# Altium PCB ledcube_v2.PcbDoc (part 8 of 18)
Units mil, origin at the board's own origin, x right, y up, seen from the top; angles counter-clockwise.
Board outline 3130 x 3300 mil, 2 copper layers (Top Layer, Bottom Layer); 188 components, 216 nets, 29515 pads, 250 vias.
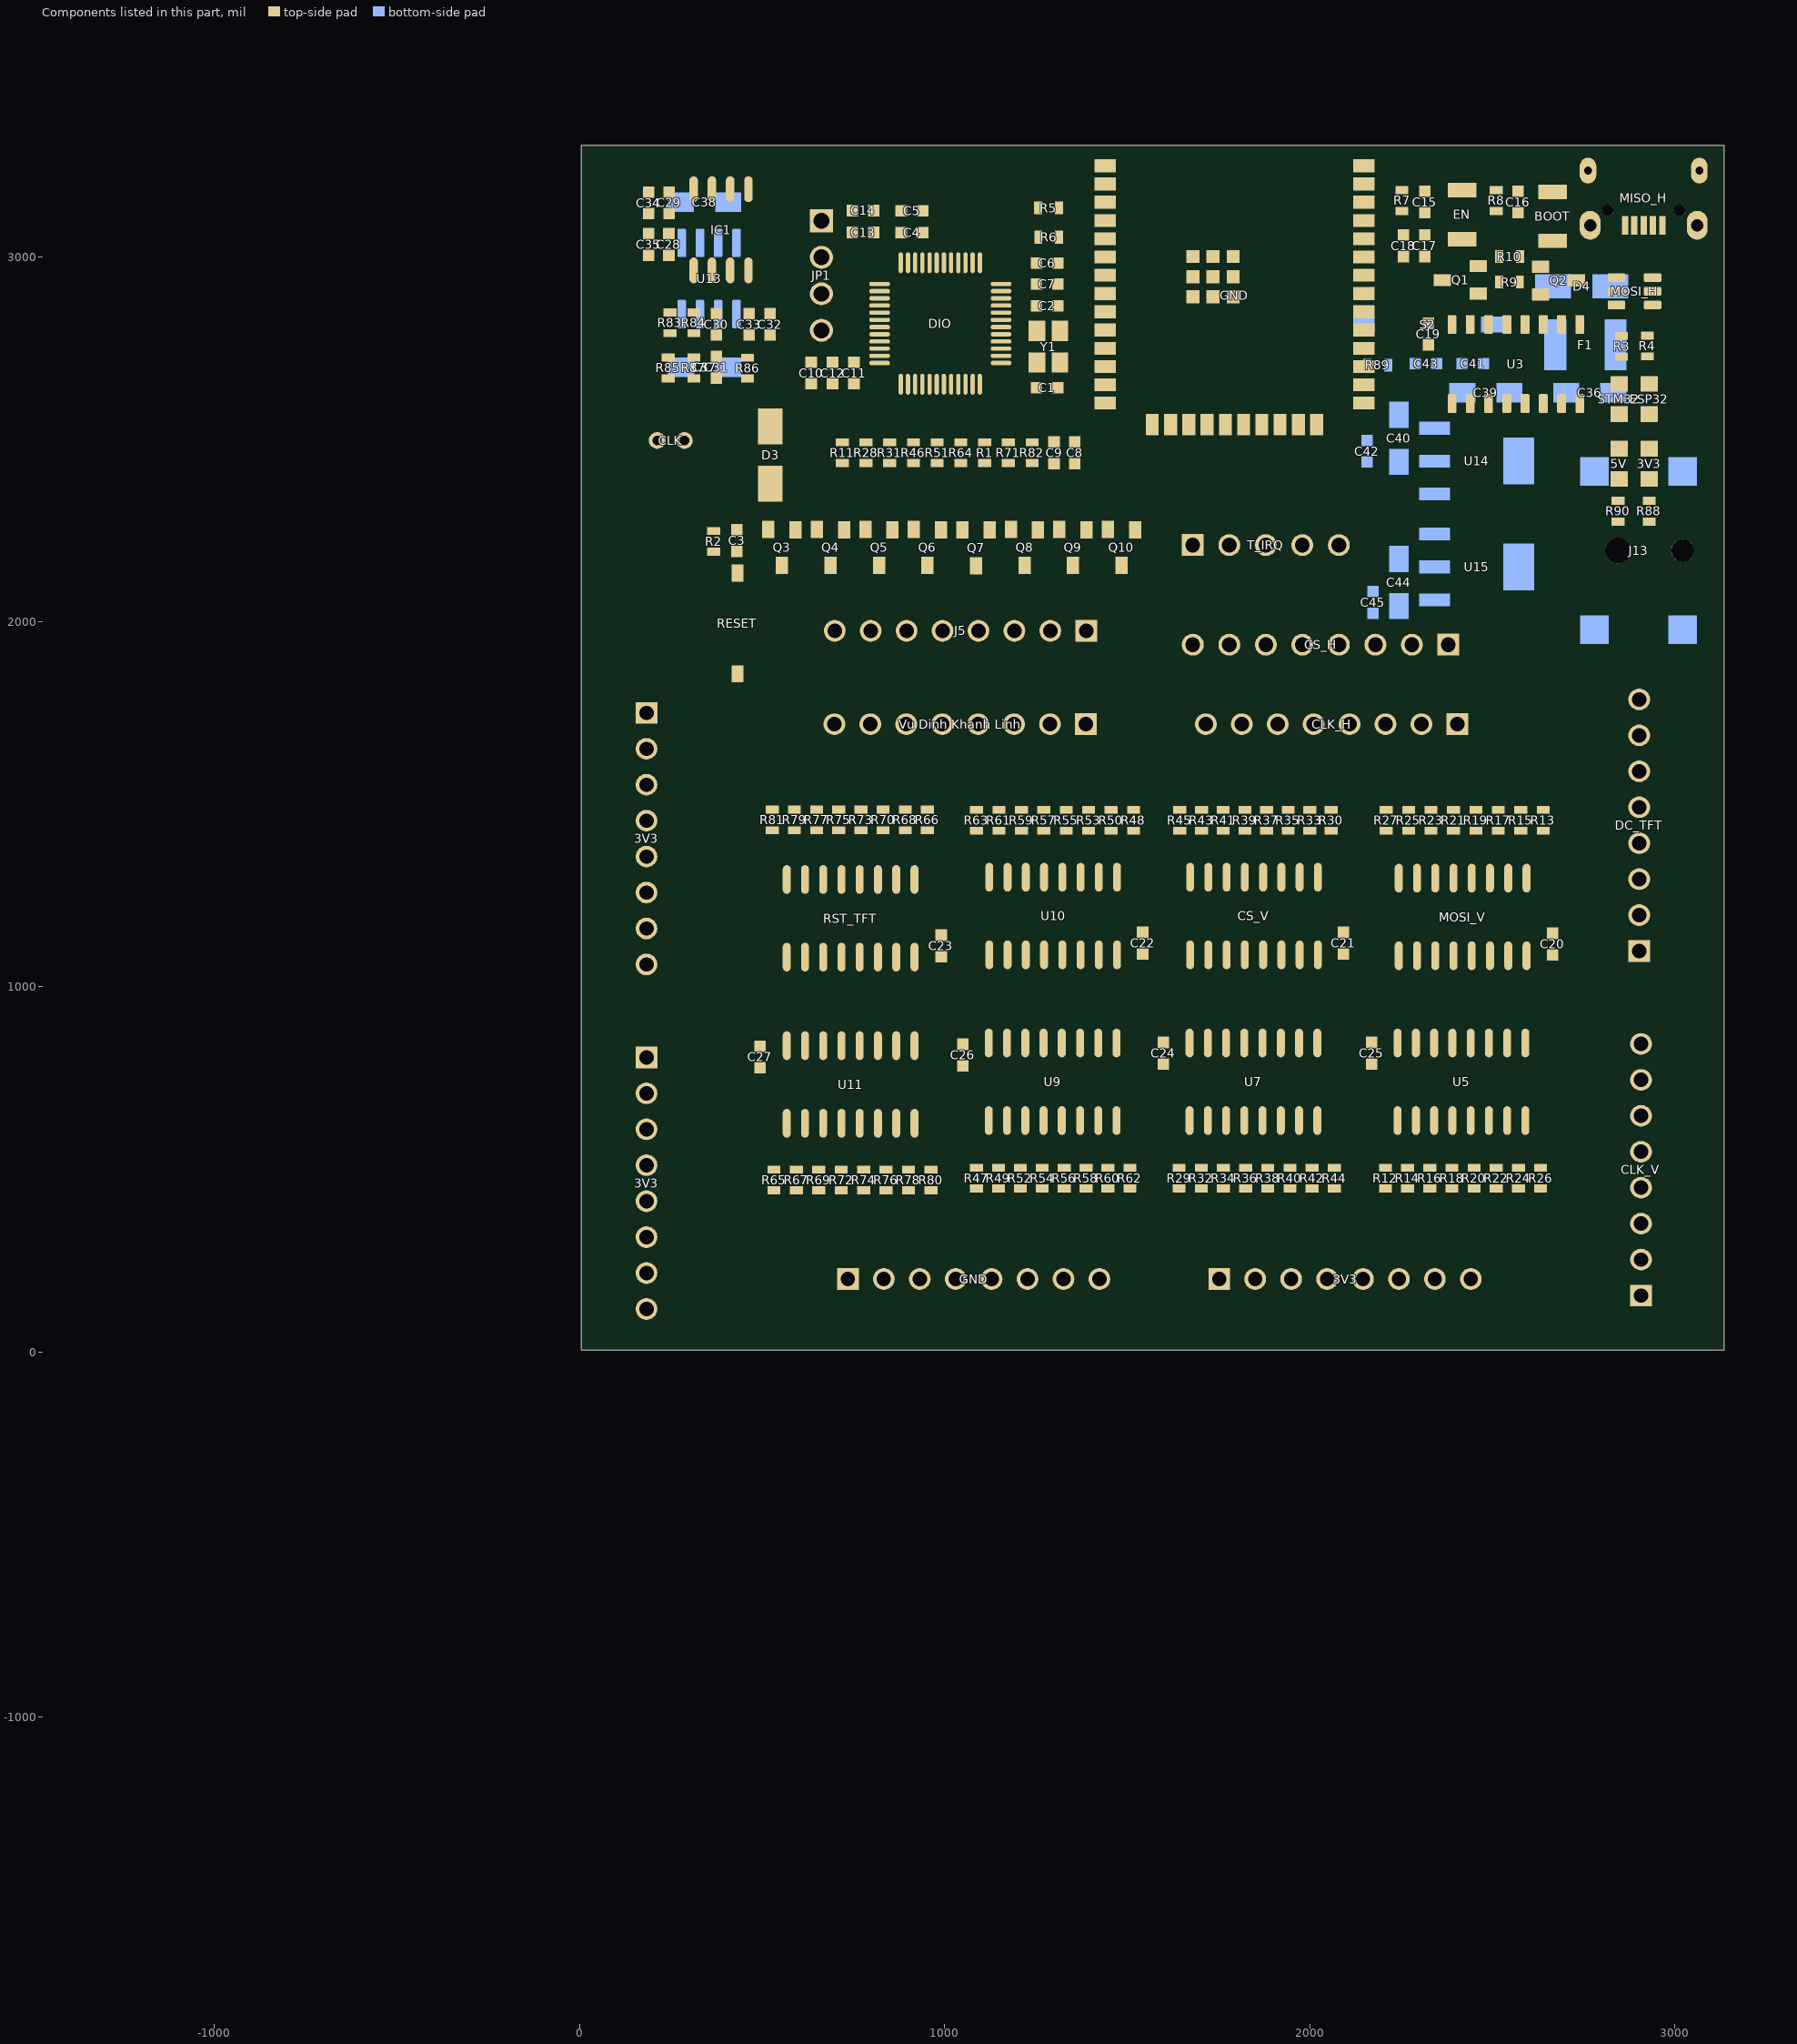
[diagram p7: the components of this part, seen from the top]

## Free pads (board coordinates) (continued)
  round 0 on Mech16: 1(-1373.37,-1735.4) 1(-1373.37,-1735.24) 1(-1373.17,-1735.49) 1(-1373.17,-1735.4) 1(-1373.17,-1735.24) 1(-1372.78,-1737.25) 1(-1372.78,-1737.25) 1(-1372.78,-1737.25) 1(-1372.78,-1737.25) 1(-1372.78,-1737.25) 1(-1372.78,-1737.25) 1(-1372.77,-1737.25) 1(-1372.77,-1737.25) 1(-1372.75,-1737.26) 1(-1372.75,-1737.26) 1(-1372.72,-1737.26) 1(-1372.72,-1737.26) 1(-1372.71,-1737.2) 1(-1372.71,-1737.2) 1(-1372.71,-1737.21) 1(-1372.71,-1737.21) 1(-1372.71,-1737.22) 1(-1372.71,-1737.22) 1(-1372.71,-1737.2) 1(-1372.71,-1737.2) 1(-1372.71,-1737.21) 1(-1372.71,-1737.21) 1(-1372.71,-1737.19) 1(-1372.71,-1737.19) 1(-1372.71,-1737.21) 1(-1372.71,-1737.21) 1(-1372.71,-1737.2) 1(-1372.71,-1737.2) 1(-1372.71,-1737.22) 1(-1372.71,-1737.22) 1(-1372.71,-1737.22) 1(-1372.71,-1737.22) 1(-1372.71,-1737.19) 1(-1372.71,-1737.19) 1(-1372.71,-1737.19) 1(-1372.71,-1737.19) 1(-1372.71,-1737.22) 1(-1372.71,-1737.22) 1(-1372.7,-1737.22) 1(-1372.7,-1737.22) 1(-1372.7,-1737.19) 1(-1372.7,-1737.19) 1(-1372.7,-1737.18) 1(-1372.7,-1737.18) 1(-1372.7,-1737.19) 1(-1372.7,-1737.19) 1(-1372.7,-1737.18) 1(-1372.7,-1737.18) 1(-1372.7,-1737.22) 1(-1372.7,-1737.22) 1(-1372.7,-1737.22) 1(-1372.7,-1737.22) 1(-1372.7,-1737.18) 1(-1372.7,-1737.18) 1(-1372.7,-1737.17) 1(-1372.7,-1737.17) 1(-1372.7,-1737.22) 1(-1372.7,-1737.22) 1(-1372.7,-1737.17) 1(-1372.7,-1737.17) 1(-1372.7,-1737.17) 1(-1372.7,-1737.17) 1(-1372.7,-1737.23) 1(-1372.7,-1737.23) 1(-1372.69,-1737.23) 1(-1372.69,-1737.23) 1(-1372.69,-1737.17) 1(-1372.69,-1737.17) 1(-1372.69,-1737.17) 1(-1372.69,-1737.17) 1(-1372.69,-1737.11) 1(-1372.69,-1737.11) 1(-1372.69,-1737.11) 1(-1372.69,-1737.11) 1(-1372.69,-1737.17) 1(-1372.69,-1737.17) 1(-1372.69,-1737.23) 1(-1372.69,-1737.23) 1(-1372.69,-1737.17) 1(-1372.69,-1737.17) 1(-1372.69,-1737.17) 1(-1372.69,-1737.17) 1(-1372.69,-1737.11) 1(-1372.69,-1737.11) 1(-1372.69,-1737.23) 1(-1372.69,-1737.23) 1(-1372.68,-1737.1) 1(-1372.68,-1737.1) 1(-1372.68,-1737.16) 1(-1372.68,-1737.16) 1(-1372.68,-1737.11) 1(-1372.68,-1737.11) 1(-1372.68,-1737.16) 1(-1372.68,-1737.16) 1(-1372.68,-1737.11) 1(-1372.68,-1737.11) 1(-1372.68,-1737.15) 1(-1372.68,-1737.15) 1(-1372.68,-1737.13) 1(-1372.68,-1737.13) 1(-1372.68,-1737.23) 1(-1372.68,-1737.23) 1(-1372.68,-1737.1) 1(-1372.68,-1737.1) 1(-1372.68,-1737.16) 1(-1372.68,-1737.16) 1(-1372.68,-1737.23) 1(-1372.68,-1737.23) 1(-1372.68,-1737.11) 1(-1372.68,-1737.11) 1(-1372.68,-1737.16) 1(-1372.68,-1737.16) 1(-1372.68,-1737.14) 1(-1372.68,-1737.14) 1(-1372.68,-1737.23) 1(-1372.68,-1737.23) 1(-1372.68,-1737.15) 1(-1372.68,-1737.15) 1(-1372.68,-1737.13) 1(-1372.68,-1737.13) 1(-1372.68,-1737.11) 1(-1372.68,-1737.11) 1(-1372.68,-1737.11) 1(-1372.68,-1737.11) 1(-1372.68,-1737.15) 1(-1372.68,-1737.15) 1(-1372.68,-1737.12) 1(-1372.68,-1737.12) 1(-1372.68,-1737.23) 1(-1372.68,-1737.23) 1(-1372.67,-1737.16) 1(-1372.67,-1737.16) 1(-1372.67,-1737.14) 1(-1372.67,-1737.14) 1(-1372.67,-1737.1) 1(-1372.67,-1737.1) 1(-1372.67,-1737.13) 1(-1372.67,-1737.13) 1(-1372.67,-1737.15) 1(-1372.67,-1737.15) 1(-1372.67,-1737.1) 1(-1372.67,-1737.1) 1(-1372.67,-1737.14) 1(-1372.67,-1737.14) 1(-1372.67,-1737.11) 1(-1372.67,-1737.11) 1(-1372.67,-1737.1) 1(-1372.67,-1737.1) 1(-1372.67,-1737.13) 1(-1372.67,-1737.13) 1(-1372.67,-1737.12) 1(-1372.67,-1737.12) 1(-1372.67,-1737.23) 1(-1372.67,-1737.23) 1(-1372.67,-1737.24) 1(-1372.67,-1737.24) 1(-1372.67,-1737.14) 1(-1372.67,-1737.14) 1(-1372.67,-1737.16) 1(-1372.67,-1737.16) 1(-1372.67,-1737.13) 1(-1372.67,-1737.13) 1(-1372.67,-1737.24) 1(-1372.67,-1737.24) 1(-1372.67,-1737.25) 1(-1372.67,-1737.25) 1(-1372.67,-1737.09) 1(-1372.67,-1737.09) 1(-1372.67,-1737.1) 1(-1372.67,-1737.1) 1(-1372.67,-1737.14) 1(-1372.67,-1737.14) 1(-1372.67,-1737.26) 1(-1372.67,-1737.26) 1(-1372.67,-1737.11) 1(-1372.67,-1737.11) 1(-1372.67,-1737.23) 1(-1372.67,-1737.23) 1(-1372.67,-1737.13) 1(-1372.67,-1737.13) 1(-1372.67,-1737.15) 1(-1372.67,-1737.15) 1(-1372.67,-1737.1) 1(-1372.67,-1737.1) 1(-1372.67,-1737.26) 1(-1372.67,-1737.26) 1(-1372.67,-1737.13) 1(-1372.67,-1737.13) 1(-1372.67,-1737.11) 1(-1372.67,-1737.11) 1(-1372.67,-1737.13) 1(-1372.67,-1737.13) 1(-1372.67,-1737.26) 1(-1372.67,-1737.26) 1(-1372.67,-1737.12) 1(-1372.67,-1737.12) 1(-1372.67,-1737.24) 1(-1372.67,-1737.24) 1(-1372.67,-1737.25) 1(-1372.67,-1737.25) 1(-1372.67,-1737.16) 1(-1372.67,-1737.16) 1(-1372.67,-1737.1) 1(-1372.67,-1737.1) 1(-1372.67,-1737.15) 1(-1372.67,-1737.15) 1(-1372.67,-1737.15) 1(-1372.67,-1737.15) 1(-1372.67,-1737.11) 1(-1372.67,-1737.11) 1(-1372.67,-1737.11) 1(-1372.67,-1737.11) 1(-1372.67,-1737.11) 1(-1372.67,-1737.11) 1(-1372.67,-1737.15) 1(-1372.67,-1737.15) 1(-1372.66,-1737.1) 1(-1372.66,-1737.1) 1(-1372.66,-1737.1) 1(-1372.66,-1737.1) 1(-1372.66,-1737.13) 1(-1372.66,-1737.13) 1(-1372.66,-1737.13) 1(-1372.66,-1737.13) 1(-1372.66,-1737.11) 1(-1372.66,-1737.11) 1(-1372.66,-1737.15) 1(-1372.66,-1737.15) 1(-1372.66,-1737.11) 1(-1372.66,-1737.11) 1(-1372.66,-1737.23) 1(-1372.66,-1737.23) 1(-1372.66,-1737.12) 1(-1372.66,-1737.12) 1(-1372.66,-1737.23) 1(-1372.66,-1737.23) 1(-1372.66,-1737.14) 1(-1372.66,-1737.14) 1(-1372.66,-1737.24) 1(-1372.66,-1737.24) 1(-1372.66,-1737.23) 1(-1372.66,-1737.23) 1(-1372.66,-1737.11) 1(-1372.66,-1737.11) 1(-1372.66,-1737.16) 1(-1372.66,-1737.16) 1(-1372.66,-1737.11) 1(-1372.66,-1737.11) 1(-1372.66,-1737.26) 1(-1372.66,-1737.26) 1(-1372.66,-1737.12) 1(-1372.66,-1737.12) 1(-1372.66,-1737.15) 1(-1372.66,-1737.15) 1(-1372.66,-1737.11) 1(-1372.66,-1737.11) 1(-1372.66,-1737.15) 1(-1372.66,-1737.15) 1(-1372.66,-1737.15) 1(-1372.66,-1737.15) 1(-1372.66,-1737.23) 1(-1372.66,-1737.23) 1(-1372.66,-1737.15) 1(-1372.66,-1737.15) 1(-1372.66,-1737.1) 1(-1372.66,-1737.1) 1(-1372.66,-1737.1) 1(-1372.66,-1737.1) 1(-1372.66,-1737.11) 1(-1372.66,-1737.11) 1(-1372.66,-1737.26) 1(-1372.66,-1737.26) 1(-1372.66,-1737.11) 1(-1372.66,-1737.11) 1(-1372.66,-1737.16) 1(-1372.66,-1737.16) 1(-1372.66,-1737.11) 1(-1372.66,-1737.11) 1(-1372.66,-1737.12) 1(-1372.66,-1737.12) 1(-1372.66,-1737.23) 1(-1372.66,-1737.23) 1(-1372.66,-1737.23) 1(-1372.66,-1737.23) 1(-1372.66,-1737.26) 1(-1372.66,-1737.26) 1(-1372.66,-1737.15) 1(-1372.66,-1737.15) 1(-1372.66,-1737.14) 1(-1372.66,-1737.14) 1(-1372.66,-1737.15) 1(-1372.66,-1737.15) 1(-1372.66,-1737.11) 1(-1372.66,-1737.11) 1(-1372.66,-1737.1) 1(-1372.66,-1737.1) 1(-1372.66,-1737.27) 1(-1372.66,-1737.27) 1(-1372.66,-1737.16) 1(-1372.66,-1737.16) 1(-1372.66,-1737.15) 1(-1372.66,-1737.15) 1(-1372.66,-1737.27) 1(-1372.66,-1737.27) 1(-1372.66,-1737.1) 1(-1372.66,-1737.1) 1(-1372.65,-1737.26) 1(-1372.65,-1737.26) 1(-1372.65,-1737.26) 1(-1372.65,-1737.26) 1(-1372.65,-1737.1) 1(-1372.65,-1737.1) 1(-1372.65,-1737.12) 1(-1372.65,-1737.12) 1(-1372.65,-1737.1) 1(-1372.65,-1737.1) 1(-1372.65,-1737.09) 1(-1372.65,-1737.09) 1(-1372.65,-1737.11) 1(-1372.65,-1737.11) 1(-1372.65,-1737.23) 1(-1372.65,-1737.23) 1(-1372.65,-1737.14) 1(-1372.65,-1737.14) 1(-1372.65,-1737.13) 1(-1372.65,-1737.13) 1(-1372.65,-1737.27) 1(-1372.65,-1737.27) 1(-1372.65,-1737.26) 1(-1372.65,-1737.26) 1(-1372.65,-1737.09) 1(-1372.65,-1737.09) 1(-1372.65,-1737.23) 1(-1372.65,-1737.23) 1(-1372.65,-1737.11) 1(-1372.65,-1737.11) 1(-1372.65,-1737.17) 1(-1372.65,-1737.17) 1(-1372.65,-1737.15) 1(-1372.65,-1737.15) 1(-1372.65,-1737.13) 1(-1372.65,-1737.13) 1(-1372.65,-1737.1) 1(-1372.65,-1737.1) 1(-1372.65,-1737.13) 1(-1372.65,-1737.13) 1(-1372.65,-1737.16) 1(-1372.65,-1737.16) 1(-1372.65,-1737.15) 1(-1372.65,-1737.15) 1(-1372.65,-1737.12) 1(-1372.65,-1737.12) 1(-1372.65,-1737.1) 1(-1372.65,-1737.1) 1(-1372.65,-1737.26) 1(-1372.65,-1737.26) 1(-1372.65,-1737.14) 1(-1372.65,-1737.14) 1(-1372.65,-1737.09) 1(-1372.65,-1737.09) 1(-1372.65,-1737.11) 1(-1372.65,-1737.11) 1(-1372.65,-1737.08) 1(-1372.65,-1737.08) 1(-1372.65,-1737.14) 1(-1372.65,-1737.14) 1(-1372.65,-1737.16) 1(-1372.65,-1737.16) 1(-1372.65,-1737.15) 1(-1372.65,-1737.15) 1(-1372.65,-1737.13) 1(-1372.65,-1737.13) 1(-1372.65,-1737.09) 1(-1372.65,-1737.09) 1(-1372.65,-1737.26) 1(-1372.65,-1737.26) 1(-1372.65,-1737.13) 1(-1372.65,-1737.13) 1(-1372.65,-1737.11) 1(-1372.65,-1737.11) 1(-1372.65,-1737.1) 1(-1372.65,-1737.1) 1(-1372.65,-1737.12) 1(-1372.65,-1737.12) 1(-1372.65,-1737.16) 1(-1372.65,-1737.16) 1(-1372.65,-1737.1) 1(-1372.65,-1737.1) 1(-1372.65,-1737.26) 1(-1372.65,-1737.26) 1(-1372.65,-1737.1) 1(-1372.65,-1737.1) 1(-1372.65,-1737.14) 1(-1372.65,-1737.14) 1(-1372.65,-1737.16) 1(-1372.65,-1737.16) 1(-1372.65,-1737.15) 1(-1372.65,-1737.15) 1(-1372.65,-1737.27) 1(-1372.65,-1737.27) 1(-1372.65,-1737.17) 1(-1372.65,-1737.17) 1(-1372.65,-1737.16) 1(-1372.65,-1737.16) 1(-1372.65,-1737.14) 1(-1372.65,-1737.14) 1(-1372.65,-1737.12) 1(-1372.65,-1737.12) 1(-1372.65,-1737.1) 1(-1372.65,-1737.1) 1(-1372.65,-1737.23) 1(-1372.65,-1737.23) 1(-1372.65,-1737.1) 1(-1372.65,-1737.1) 1(-1372.65,-1737.09) 1(-1372.65,-1737.09) 1(-1372.65,-1737.25) 1(-1372.65,-1737.25) 1(-1372.65,-1737.09) 1(-1372.65,-1737.09) 1(-1372.65,-1737.13) 1(-1372.65,-1737.13) 1(-1372.65,-1737.12) 1(-1372.65,-1737.12) 1(-1372.65,-1737.1) 1(-1372.65,-1737.1) 1(-1372.65,-1737.1) 1(-1372.65,-1737.1) 1(-1372.65,-1737.12) 1(-1372.65,-1737.12) 1(-1372.64,-1737.15) 1(-1372.64,-1737.15) 1(-1372.64,-1737.14) 1(-1372.64,-1737.14) 1(-1372.64,-1737.15) 1(-1372.64,-1737.15) 1(-1372.64,-1737.23) 1(-1372.64,-1737.23) 1(-1372.64,-1737.11) 1(-1372.64,-1737.11) 1(-1372.64,-1737.17) 1(-1372.64,-1737.17) 1(-1372.64,-1737.09) 1(-1372.64,-1737.09) 1(-1372.64,-1737.14) 1(-1372.64,-1737.14) 1(-1372.64,-1737.14) 1(-1372.64,-1737.14) 1(-1372.64,-1737.14) 1(-1372.64,-1737.14) 1(-1372.64,-1737.11) 1(-1372.64,-1737.11) 1(-1372.64,-1737.15) 1(-1372.64,-1737.15) 1(-1372.64,-1737.11) 1(-1372.64,-1737.11) 1(-1372.64,-1737.15) 1(-1372.64,-1737.15) 1(-1372.64,-1737.17) 1(-1372.64,-1737.17) 1(-1372.64,-1737.15) 1(-1372.64,-1737.15) 1(-1372.64,-1737.1) 1(-1372.64,-1737.1) 1(-1372.64,-1737.09) 1(-1372.64,-1737.09) 1(-1372.64,-1737.14) 1(-1372.64,-1737.14) 1(-1372.64,-1737.22) 1(-1372.64,-1737.22) 1(-1372.64,-1737.23) 1(-1372.64,-1737.23) 1(-1372.64,-1737.11) 1(-1372.64,-1737.11) 1(-1372.64,-1737.09) 1(-1372.64,-1737.09) 1(-1372.64,-1737.09) 1(-1372.64,-1737.09) 1(-1372.64,-1737.15) 1(-1372.64,-1737.15) 1(-1372.64,-1737.13) 1(-1372.64,-1737.13) 1(-1372.64,-1737.15) 1(-1372.64,-1737.15) 1(-1372.64,-1737.27) 1(-1372.64,-1737.27) 1(-1372.64,-1737.26) 1(-1372.64,-1737.26) 1(-1372.64,-1737.22) 1(-1372.64,-1737.22) 1(-1372.64,-1737.11) 1(-1372.64,-1737.11) 1(-1372.64,-1737.23) 1(-1372.64,-1737.23) 1(-1372.64,-1737.13) 1(-1372.64,-1737.13) 1(-1372.64,-1737.09) 1(-1372.64,-1737.09) 1(-1372.64,-1737.27) 1(-1372.64,-1737.27) 1(-1372.64,-1737.14) 1(-1372.64,-1737.14) 1(-1372.64,-1737.09) 1(-1372.64,-1737.09) 1(-1372.64,-1737.11) 1(-1372.64,-1737.11) 1(-1372.64,-1737.15) 1(-1372.64,-1737.15) 1(-1372.64,-1737.17) 1(-1372.64,-1737.17) 1(-1372.64,-1737.13) 1(-1372.64,-1737.13) 1(-1372.64,-1737.12) 1(-1372.64,-1737.12) 1(-1372.64,-1737.1) 1(-1372.64,-1737.1) 1(-1372.64,-1737.17) 1(-1372.64,-1737.17) 1(-1372.64,-1737.08) 1(-1372.64,-1737.08) 1(-1372.64,-1737.26) 1(-1372.64,-1737.26) 1(-1372.64,-1737.17) 1(-1372.64,-1737.17) 1(-1372.64,-1737.25) 1(-1372.64,-1737.25) 1(-1372.64,-1737.25) 1(-1372.64,-1737.25) 1(-1372.64,-1737.17) 1(-1372.64,-1737.17) 1(-1372.64,-1737.22) 1(-1372.64,-1737.22) 1(-1372.64,-1737.15) 1(-1372.64,-1737.15) 1(-1372.64,-1737.14) 1(-1372.64,-1737.14) 1(-1372.64,-1737.13) 1(-1372.64,-1737.13) 1(-1372.64,-1737.12) 1(-1372.64,-1737.12) 1(-1372.64,-1737.08) 1(-1372.64,-1737.08) 1(-1372.64,-1737.11) 1(-1372.64,-1737.11) 1(-1372.64,-1737.23) 1(-1372.64,-1737.23) 1(-1372.64,-1737.09) 1(-1372.64,-1737.09) 1(-1372.64,-1737.22) 1(-1372.64,-1737.22) 1(-1372.64,-1737.09) 1(-1372.64,-1737.09) 1(-1372.63,-1737.16) 1(-1372.63,-1737.16) 1(-1372.63,-1737.18) 1(-1372.63,-1737.18) 1(-1372.63,-1737.11) 1(-1372.63,-1737.11) 1(-1372.63,-1737.1) 1(-1372.63,-1737.1) 1(-1372.63,-1737.09) 1(-1372.63,-1737.09) 1(-1372.63,-1737.16) 1(-1372.63,-1737.16) 1(-1372.63,-1737.22) 1(-1372.63,-1737.22) 1(-1372.63,-1737.12) 1(-1372.63,-1737.12) 1(-1372.63,-1737.18) 1(-1372.63,-1737.18) 1(-1372.63,-1737.08) 1(-1372.63,-1737.08) 1(-1372.63,-1737.13) 1(-1372.63,-1737.13) 1(-1372.63,-1737.1) 1(-1372.63,-1737.1) 1(-1372.63,-1737.11) 1(-1372.63,-1737.11) 1(-1372.63,-1737.16) 1(-1372.63,-1737.16) 1(-1372.63,-1737.13) 1(-1372.63,-1737.13) 1(-1372.63,-1737.19) 1(-1372.63,-1737.19) 1(-1372.63,-1737.09) 1(-1372.63,-1737.09) 1(-1372.63,-1737.22) 1(-1372.63,-1737.22) 1(-1372.63,-1737.17) 1(-1372.63,-1737.17) 1(-1372.63,-1737.11) 1(-1372.63,-1737.11) 1(-1372.63,-1737.13) 1(-1372.63,-1737.13) 1(-1372.63,-1737.11) 1(-1372.63,-1737.11) 1(-1372.63,-1737.17) 1(-1372.63,-1737.17) 1(-1372.63,-1737.19) 1(-1372.63,-1737.19) 1(-1372.63,-1737.09) 1(-1372.63,-1737.09) 1(-1372.63,-1737.13) 1(-1372.63,-1737.13) 1(-1372.63,-1737.11) 1(-1372.63,-1737.11) 1(-1372.63,-1737.17) 1(-1372.63,-1737.17) 1(-1372.63,-1737.22) 1(-1372.63,-1737.22) 1(-1372.63,-1737.14) 1(-1372.63,-1737.14) 1(-1372.63,-1737.1) 1(-1372.63,-1737.1) 1(-1372.63,-1737.1) 1(-1372.63,-1737.1) 1(-1372.63,-1737.12) 1(-1372.63,-1737.12) 1(-1372.63,-1737.11) 1(-1372.63,-1737.11) 1(-1372.63,-1737.14) 1(-1372.63,-1737.14) 1(-1372.63,-1737.11) 1(-1372.63,-1737.11) 1(-1372.63,-1737.08) 1(-1372.63,-1737.08) 1(-1372.63,-1737.14) 1(-1372.63,-1737.14) 1(-1372.63,-1737.13) 1(-1372.63,-1737.13) 1(-1372.63,-1737.09) 1(-1372.63,-1737.09) 1(-1372.63,-1737.17) 1(-1372.63,-1737.17) 1(-1372.63,-1737.19) 1(-1372.63,-1737.19) 1(-1372.63,-1737.11) 1(-1372.63,-1737.11) 1(-1372.63,-1737.17) 1(-1372.63,-1737.17) 1(-1372.63,-1737.08) 1(-1372.63,-1737.08) 1(-1372.63,-1737.12) 1(-1372.63,-1737.12) 1(-1372.63,-1737.18) 1(-1372.63,-1737.18) 1(-1372.63,-1737.13) 1(-1372.63,-1737.13) 1(-1372.63,-1737.16) 1(-1372.63,-1737.16) 1(-1372.63,-1737.16) 1(-1372.63,-1737.16) 1(-1372.63,-1737.17) 1(-1372.63,-1737.17) 1(-1372.63,-1737.14) 1(-1372.63,-1737.14) 1(-1372.63,-1737.09) 1(-1372.63,-1737.09) 1(-1372.63,-1737.17) 1(-1372.63,-1737.17) 1(-1372.63,-1737.16) 1(-1372.63,-1737.16) 1(-1372.63,-1737.14) 1(-1372.63,-1737.14) 1(-1372.63,-1737.18) 1(-1372.63,-1737.18) 1(-1372.63,-1737.22) 1(-1372.63,-1737.22) 1(-1372.63,-1737.16) 1(-1372.63,-1737.16) 1(-1372.63,-1737.21) 1(-1372.63,-1737.21) 1(-1372.63,-1737.11) 1(-1372.63,-1737.11) 1(-1372.63,-1737.06) 1(-1372.63,-1737.06) 1(-1372.63,-1737.16) 1(-1372.63,-1737.16) 1(-1372.63,-1737.12) 1(-1372.63,-1737.12) 1(-1372.63,-1737.12) 1(-1372.63,-1737.12) 1(-1372.63,-1737.11) 1(-1372.63,-1737.11) 1(-1372.63,-1737.17) 1(-1372.63,-1737.17) 1(-1372.63,-1737.18) 1(-1372.63,-1737.18) 1(-1372.62,-1737.2) 1(-1372.62,-1737.2) 1(-1372.62,-1737.14) 1(-1372.62,-1737.14) 1(-1372.62,-1737.18) 1(-1372.62,-1737.18) 1(-1372.62,-1737.16) 1(-1372.62,-1737.16) 1(-1372.62,-1737.14) 1(-1372.62,-1737.14) 1(-1372.62,-1737.21) 1(-1372.62,-1737.21) 1(-1372.62,-1737.11) 1(-1372.62,-1737.11) 1(-1372.62,-1737.09) 1(-1372.62,-1737.09) 1(-1372.62,-1737.18) 1(-1372.62,-1737.18) 1(-1372.62,-1737.2) 1(-1372.62,-1737.2) 1(-1372.62,-1737.18) 1(-1372.62,-1737.18) 1(-1372.62,-1737.13) 1(-1372.62,-1737.13) 1(-1372.62,-1737.12) 1(-1372.62,-1737.12) 1(-1372.62,-1737.11) 1(-1372.62,-1737.11) 1(-1372.62,-1737.09) 1(-1372.62,-1737.09) 1(-1372.62,-1737.08) 1(-1372.62,-1737.08) 1(-1372.62,-1737.23) 1(-1372.62,-1737.23) 1(-1372.62,-1737.1) 1(-1372.62,-1737.1) 1(-1372.62,-1737.11) 1(-1372.62,-1737.11) 1(-1372.62,-1737.08) 1(-1372.62,-1737.08) 1(-1372.62,-1737.14) 1(-1372.62,-1737.14) 1(-1372.62,-1737.08) 1(-1372.62,-1737.08) 1(-1372.62,-1737.14) 1(-1372.62,-1737.14) 1(-1372.62,-1737.1) 1(-1372.62,-1737.1) 1(-1372.62,-1737.1) 1(-1372.62,-1737.1) 1(-1372.62,-1737.12) 1(-1372.62,-1737.12) 1(-1372.62,-1737.11) 1(-1372.62,-1737.11) 1(-1372.62,-1737.13) 1(-1372.62,-1737.13) 1(-1372.62,-1737.14) 1(-1372.62,-1737.14) 1(-1372.62,-1737.12) 1(-1372.62,-1737.12) 1(-1372.62,-1737.08) 1(-1372.62,-1737.08) 1(-1372.62,-1737.09) 1(-1372.62,-1737.09) 1(-1372.62,-1737.13) 1(-1372.62,-1737.13) 1(-1372.62,-1737.1) 1(-1372.62,-1737.1) 1(-1372.62,-1737.08) 1(-1372.62,-1737.08) 1(-1372.62,-1737.1) 1(-1372.62,-1737.1) 1(-1372.62,-1737.14) 1(-1372.62,-1737.14) 1(-1372.62,-1737.13) 1(-1372.62,-1737.13) 1(-1372.62,-1737.11) 1(-1372.62,-1737.11) 1(-1372.62,-1737.23) 1(-1372.62,-1737.23) 1(-1372.62,-1737.15) 1(-1372.62,-1737.15) 1(-1372.62,-1737.16) 1(-1372.62,-1737.16) 1(-1372.62,-1737.09) 1(-1372.62,-1737.09) 1(-1372.62,-1737.14) 1(-1372.62,-1737.14) 1(-1372.62,-1737.07) 1(-1372.62,-1737.07) 1(-1372.62,-1737.13) 1(-1372.62,-1737.13) 1(-1372.62,-1737.12) 1(-1372.62,-1737.12) 1(-1372.62,-1737.11) 1(-1372.62,-1737.11) 1(-1372.62,-1737.1) 1(-1372.62,-1737.1) 1(-1372.62,-1737.09) 1(-1372.62,-1737.09) 1(-1372.62,-1737.08) 1(-1372.62,-1737.08) 1(-1372.62,-1737.09) 1(-1372.62,-1737.09) 1(-1372.62,-1737.14) 1(-1372.62,-1737.14) 1(-1372.62,-1737.11) 1(-1372.62,-1737.11) 1(-1372.62,-1737.08) 1(-1372.62,-1737.08) 1(-1372.62,-1737.15) 1(-1372.62,-1737.15) 1(-1372.62,-1737.14) 1(-1372.62,-1737.14) 1(-1372.62,-1737.12) 1(-1372.62,-1737.12) 1(-1372.62,-1737.1) 1(-1372.62,-1737.1) 1(-1372.62,-1737.24) 1(-1372.62,-1737.24) 1(-1372.62,-1737.15) 1(-1372.62,-1737.15) 1(-1372.62,-1737.08) 1(-1372.62,-1737.08) 1(-1372.61,-1737.08) 1(-1372.61,-1737.08) 1(-1372.61,-1737.08) 1(-1372.61,-1737.08) 1(-1372.61,-1737.15) 1(-1372.61,-1737.15) 1(-1372.61,-1737.13) 1(-1372.61,-1737.13) 1(-1372.61,-1737.12) 1(-1372.61,-1737.12) 1(-1372.61,-1737.1) 1(-1372.61,-1737.1) 1(-1372.61,-1737.08) 1(-1372.61,-1737.08) 1(-1372.61,-1737.08) 1(-1372.61,-1737.08) 1(-1372.61,-1737.27) 1(-1372.61,-1737.27) 1(-1372.61,-1737.1) 1(-1372.61,-1737.1) 1(-1372.61,-1737.15) 1(-1372.61,-1737.15) 1(-1372.61,-1737.14) 1(-1372.61,-1737.14) 1(-1372.61,-1737.12) 1(-1372.61,-1737.12) 1(-1372.61,-1737.1) 1(-1372.61,-1737.1) 1(-1372.61,-1737.14) 1(-1372.61,-1737.14) 1(-1372.61,-1737.11) 1(-1372.61,-1737.11) 1(-1372.61,-1737.08) 1(-1372.61,-1737.08) 1(-1372.61,-1737.13) 1(-1372.61,-1737.13) 1(-1372.61,-1737.13) 1(-1372.61,-1737.13) 1(-1372.61,-1737.13) 1(-1372.61,-1737.13) 1(-1372.61,-1737.1) 1(-1372.61,-1737.1) 1(-1372.61,-1737.06) 1(-1372.61,-1737.06) 1(-1372.61,-1737.13) 1(-1372.61,-1737.13) 1(-1372.61,-1737.09) 1(-1372.61,-1737.09) 1(-1372.61,-1737.1) 1(-1372.61,-1737.1) 1(-1372.61,-1737.13) 1(-1372.61,-1737.13) 1(-1372.61,-1737.12) 1(-1372.61,-1737.12) 1(-1372.61,-1737.24) 1(-1372.61,-1737.24) 1(-1372.61,-1737.14) 1(-1372.61,-1737.14) 1(-1372.61,-1737.1) 1(-1372.61,-1737.1) 1(-1372.61,-1737.08) 1(-1372.61,-1737.08) 1(-1372.61,-1737.09) 1(-1372.61,-1737.09) 1(-1372.61,-1737.13) 1(-1372.61,-1737.13) 1(-1372.61,-1737.09) 1(-1372.61,-1737.09) 1(-1372.61,-1737.1) 1(-1372.61,-1737.1) 1(-1372.61,-1737.1) 1(-1372.61,-1737.1) 1(-1372.61,-1737.13) 1(-1372.61,-1737.13) 1(-1372.61,-1737.14) 1(-1372.61,-1737.14) 1(-1372.61,-1737.08) 1(-1372.61,-1737.08) 1(-1372.6,-1737.09) 1(-1372.6,-1737.09) 1(-1372.6,-1737.09) 1(-1372.6,-1737.09) 1(-1372.6,-1737.07) 1(-1372.6,-1737.07) 1(-1372.6,-1737.1) 1(-1372.6,-1737.1) 1(-1372.6,-1737.09) 1(-1372.6,-1737.09) 1(-1372.6,-1737.07) 1(-1372.6,-1737.07) 1(-1372.6,-1737.07) 1(-1372.6,-1737.07) 1(-1372.6,-1737.24) 1(-1372.6,-1737.24) 1(-1372.6,-1737.13) 1(-1372.6,-1737.13) 1(-1372.6,-1737.09) 1(-1372.6,-1737.09) 1(-1372.6,-1737.13) 1(-1372.6,-1737.13) 1(-1372.6,-1737.13) 1(-1372.6,-1737.13) 1(-1372.6,-1737.09) 1(-1372.6,-1737.09) 1(-1372.6,-1737.07) 1(-1372.6,-1737.07) 1(-1372.6,-1737.06) 1(-1372.6,-1737.06) 1(-1372.6,-1737.1) 1(-1372.6,-1737.1) 1(-1372.6,-1737.07) 1(-1372.6,-1737.07) 1(-1372.6,-1737.13) 1(-1372.6,-1737.13) 1(-1372.6,-1737.12) 1(-1372.6,-1737.12) 1(-1372.6,-1737.13) 1(-1372.6,-1737.13) 1(-1372.6,-1737.24) 1(-1372.6,-1737.24) 1(-1372.6,-1737.14) 1(-1372.6,-1737.14) 1(-1372.6,-1737.07) 1(-1372.6,-1737.07) 1(-1372.6,-1737.13) 1(-1372.6,-1737.13) 1(-1372.6,-1737.06) 1(-1372.6,-1737.06) 1(-1372.6,-1737.13) 1(-1372.6,-1737.13) 1(-1372.6,-1737.07) 1(-1372.6,-1737.07) 1(-1372.6,-1737.06) 1(-1372.6,-1737.06) 1(-1372.6,-1737.07) 1(-1372.6,-1737.07) 1(-1372.6,-1737.12) 1(-1372.6,-1737.12) 1(-1372.6,-1737.08) 1(-1372.6,-1737.08) 1(-1372.6,-1737.24) 1(-1372.6,-1737.24) 1(-1372.6,-1737.13) 1(-1372.6,-1737.13) 1(-1372.6,-1737.1) 1(-1372.6,-1737.1) 1(-1372.6,-1737.08) 1(-1372.6,-1737.08) 1(-1372.6,-1737.07) 1(-1372.6,-1737.07) 1(-1372.6,-1737.07) 1(-1372.6,-1737.07) 1(-1372.6,-1737.11) 1(-1372.6,-1737.11) 1(-1372.6,-1737.07) 1(-1372.6,-1737.07) 1(-1372.6,-1737.07) 1(-1372.6,-1737.07) 1(-1372.6,-1737.14) 1(-1372.6,-1737.14) 1(-1372.6,-1737.13) 1(-1372.6,-1737.13) 1(-1372.6,-1737.11) 1(-1372.6,-1737.11) 1(-1372.6,-1737.14) 1(-1372.6,-1737.14) 1(-1372.6,-1737.12) 1(-1372.6,-1737.12) 1(-1372.6,-1737.07) 1(-1372.6,-1737.07) 1(-1372.59,-1737.1) 1(-1372.59,-1737.1) 1(-1372.59,-1737.07) 1(-1372.59,-1737.07) 1(-1372.59,-1737.12) 1(-1372.59,-1737.12) 1(-1372.59,-1737.11) 1(-1372.59,-1737.11) 1(-1372.59,-1737.09) 1(-1372.59,-1737.09) 1(-1372.59,-1737.07) 1(-1372.59,-1737.07) 1(-1372.59,-1737.14) 1(-1372.59,-1737.14) 1(-1372.59,-1737.05) 1(-1372.59,-1737.05) 1(-1372.59,-1737.07) 1(-1372.59,-1737.07) 1(-1372.59,-1737.24) 1(-1372.59,-1737.24) 1(-1372.59,-1737.11) 1(-1372.59,-1737.11) 1(-1372.59,-1737.09) 1(-1372.59,-1737.09) 1(-1372.59,-1737.14) 1(-1372.59,-1737.14) 1(-1372.59,-1737.13) 1(-1372.59,-1737.13) 1(-1372.59,-1737.14) 1(-1372.59,-1737.14) 1(-1372.59,-1737.06) 1(-1372.59,-1737.06) 1(-1372.59,-1737.13) 1(-1372.59,-1737.13) 1(-1372.59,-1737.11) 1(-1372.59,-1737.11) 1(-1372.59,-1737.09) 1(-1372.59,-1737.09) 1(-1372.59,-1737.1) 1(-1372.59,-1737.1) 1(-1372.59,-1737.08) 1(-1372.59,-1737.08) 1(-1372.59,-1737.12) 1(-1372.59,-1737.12) 1(-1372.59,-1737.08) 1(-1372.59,-1737.08) 1(-1372.59,-1737.09) 1(-1372.59,-1737.09) 1(-1372.59,-1737.13) 1(-1372.59,-1737.13) 1(-1372.59,-1737.09) 1(-1372.59,-1737.09) 1(-1372.59,-1737.09) 1(-1372.59,-1737.09) 1(-1372.59,-1737.12) 1(-1372.59,-1737.12) 1(-1372.59,-1737.13) 1(-1372.59,-1737.13) 1(-1372.59,-1737.09) 1(-1372.59,-1737.09) 1(-1372.59,-1737.08) 1(-1372.59,-1737.08) 1(-1372.59,-1737.08) 1(-1372.59,-1737.08) 1(-1372.59,-1737.05) 1(-1372.59,-1737.05) 1(-1372.59,-1737.08) 1(-1372.59,-1737.08) 1(-1372.59,-1737.07) 1(-1372.59,-1737.07) 1(-1372.59,-1737.11) 1(-1372.59,-1737.11) 1(-1372.59,-1737.08) 1(-1372.59,-1737.08) 1(-1372.59,-1737.06) 1(-1372.59,-1737.06) 1(-1372.58,-1737.28) 1(-1372.58,-1737.28) 1(-1372.58,-1737.12) 1(-1372.58,-1737.12) 1(-1372.58,-1737.13) 1(-1372.58,-1737.13) 1(-1372.58,-1737.27) 1(-1372.58,-1737.27) 1(-1372.58,-1737.27) 1(-1372.58,-1737.27) 1(-1372.58,-1737.27) 1(-1372.58,-1737.27) 1(-1372.58,-1737.09) 1(-1372.58,-1737.09) 1(-1372.58,-1737.08) 1(-1372.58,-1737.08) 1(-1372.58,-1737.12) 1(-1372.58,-1737.12) 1(-1372.58,-1737.27) 1(-1372.58,-1737.27) 1(-1372.58,-1737.27) 1(-1372.58,-1737.27) 1(-1372.58,-1737.08) 1(-1372.58,-1737.08) 1(-1372.58,-1737.08) 1(-1372.58,-1737.08) 1(-1372.58,-1737.28) 1(-1372.58,-1737.28) 1(-1372.58,-1737.28) 1(-1372.58,-1737.28) 1(-1372.58,-1737.13) 1(-1372.58,-1737.13) 1(-1372.58,-1737.08) 1(-1372.58,-1737.08) 1(-1372.58,-1737.12) 1(-1372.58,-1737.12) 1(-1372.58,-1737.08) 1(-1372.58,-1737.08) 1(-1372.58,-1737.08) 1(-1372.58,-1737.08) 1(-1372.58,-1737.13) 1(-1372.58,-1737.13) 1(-1372.58,-1737.08) 1(-1372.58,-1737.08) 1(-1372.58,-1737.12) 1(-1372.58,-1737.12) 1(-1372.58,-1737.27) 1(-1372.58,-1737.27) 1(-1372.58,-1737.06) 1(-1372.58,-1737.06) 1(-1372.58,-1737.03) 1(-1372.58,-1737.03) 1(-1372.58,-1737.12) 1(-1372.58,-1737.12) 1(-1372.58,-1737.25) 1(-1372.58,-1737.25) 1(-1372.58,-1737.27) 1(-1372.58,-1737.27) 1(-1372.58,-1737.12) 1(-1372.58,-1737.12) 1(-1372.58,-1737.05) 1(-1372.58,-1737.05) 1(-1372.58,-1737.08) 1(-1372.58,-1737.08) 1(-1372.58,-1737.27) 1(-1372.58,-1737.27) 1(-1372.58,-1737.13) 1(-1372.58,-1737.13) 1(-1372.58,-1737.11) 1(-1372.58,-1737.11) 1(-1372.58,-1737.04) 1(-1372.58,-1737.04) 1(-1372.58,-1737.08) 1(-1372.58,-1737.08) 1(-1372.58,-1737.09) 1(-1372.58,-1737.09) 1(-1372.58,-1737.05) 1(-1372.58,-1737.05) 1(-1372.58,-1737.05) 1(-1372.58,-1737.05) 1(-1372.58,-1737.27) 1(-1372.58,-1737.27) 1(-1372.57,-1737.13) 1(-1372.57,-1737.13) 1(-1372.57,-1737.26) 1(-1372.57,-1737.26) 1(-1372.57,-1737.26) 1(-1372.57,-1737.26) 1(-1372.57,-1737.26) 1(-1372.57,-1737.26) 1(-1372.57,-1737.06) 1(-1372.57,-1737.06) 1(-1372.57,-1737.27) 1(-1372.57,-1737.27) 1(-1372.57,-1737.26) 1(-1372.57,-1737.26) 1(-1372.57,-1737.13) 1(-1372.57,-1737.13) 1(-1372.57,-1737.06) 1(-1372.57,-1737.06) 1(-1372.57,-1737.04) 1(-1372.57,-1737.04) 1(-1372.57,-1737.26) 1(-1372.57,-1737.26) 1(-1372.57,-1737.05) 1(-1372.57,-1737.05) 1(-1372.57,-1737.27) 1(-1372.57,-1737.27) 1(-1372.57,-1737.26) 1(-1372.57,-1737.26) 1(-1372.57,-1737.06) 1(-1372.57,-1737.06) 1(-1372.57,-1737.06) 1(-1372.57,-1737.06) 1(-1372.57,-1737.27) 1(-1372.57,-1737.27) 1(-1372.57,-1737.13) 1(-1372.57,-1737.13) 1(-1372.57,-1737.05) 1(-1372.57,-1737.05) 1(-1372.57,-1737.05) 1(-1372.57,-1737.05) 1(-1372.57,-1737.03) 1(-1372.57,-1737.03) 1(-1372.57,-1737.05) 1(-1372.57,-1737.05) 1(-1372.57,-1737.27) 1(-1372.57,-1737.27) 1(-1372.57,-1737.13) 1(-1372.57,-1737.13) 1(-1372.57,-1737.27) 1(-1372.57,-1737.27) 1(-1372.57,-1737.05) 1(-1372.57,-1737.05) 1(-1372.57,-1737.27) 1(-1372.57,-1737.27) 1(-1372.57,-1737.13) 1(-1372.57,-1737.13) 1(-1372.57,-1737.05) 1(-1372.57,-1737.05) 1(-1372.57,-1737.27) 1(-1372.57,-1737.27) 1(-1372.57,-1737.13) 1(-1372.57,-1737.13) 1(-1372.57,-1737.06) 1(-1372.57,-1737.06) 1(-1372.57,-1737.05) 1(-1372.57,-1737.05) 1(-1372.57,-1737.05) 1(-1372.57,-1737.05) 1(-1372.57,-1737.13) 1(-1372.57,-1737.13) 1(-1372.57,-1737.28) 1(-1372.57,-1737.28) 1(-1372.57,-1737.27) 1(-1372.57,-1737.27) 1(-1372.57,-1737.27) 1(-1372.57,-1737.27) 1(-1372.57,-1737.26) 1(-1372.57,-1737.26) 1(-1372.57,-1737.05) 1(-1372.57,-1737.05) 1(-1372.57,-1737.13) 1(-1372.57,-1737.13) 1(-1372.57,-1737.09) 1(-1372.57,-1737.09) 1(-1372.57,-1737.12) 1(-1372.57,-1737.12) 1(-1372.57,-1737.09) 1(-1372.57,-1737.09) 1(-1372.57,-1737.26) 1(-1372.57,-1737.26) 1(-1372.57,-1737.13) 1(-1372.57,-1737.13) 1(-1372.57,-1737.13) 1(-1372.57,-1737.13) 1(-1372.56,-1737.09) 1(-1372.56,-1737.09) 1(-1372.56,-1737.08) 1(-1372.56,-1737.08) 1(-1372.56,-1737.27) 1(-1372.56,-1737.27) 1(-1372.56,-1737.27) 1(-1372.56,-1737.27) 1(-1372.56,-1737.27) 1(-1372.56,-1737.27) 1(-1372.56,-1737.12) 1(-1372.56,-1737.12) 1(-1372.56,-1737.12) 1(-1372.56,-1737.12) 1(-1372.56,-1737.09) 1(-1372.56,-1737.09) 1(-1372.56,-1737.27) 1(-1372.56,-1737.27) 1(-1372.56,-1737.13) 1(-1372.56,-1737.13) 1(-1372.56,-1737.29) 1(-1372.56,-1737.29) 1(-1372.56,-1737.25) 1(-1372.56,-1737.25) 1(-1372.56,-1737.03) 1(-1372.56,-1737.03) 1(-1372.56,-1737.26) 1(-1372.56,-1737.26) 1(-1372.56,-1737.26) 1(-1372.56,-1737.26) 1(-1372.56,-1737.12) 1(-1372.56,-1737.12) 1(-1372.56,-1737.26) 1(-1372.56,-1737.26) 1(-1372.56,-1737.26) 1(-1372.56,-1737.26) 1(-1372.56,-1737.05) 1(-1372.56,-1737.05) 1(-1372.56,-1737.13) 1(-1372.56,-1737.13) 1(-1372.56,-1737.26) 1(-1372.56,-1737.26) 1(-1372.56,-1737.13) 1(-1372.56,-1737.13) 1(-1372.56,-1737.05) 1(-1372.56,-1737.05) 1(-1372.56,-1737.26) 1(-1372.56,-1737.26) 1(-1372.56,-1737.05) 1(-1372.56,-1737.05) 1(-1372.56,-1737.03) 1(-1372.56,-1737.03) 1(-1372.56,-1737.12) 1(-1372.56,-1737.12) 1(-1372.56,-1737.09) 1(-1372.56,-1737.09) 1(-1372.56,-1737.25) 1(-1372.56,-1737.25) 1(-1372.56,-1737.07) 1(-1372.56,-1737.07) 1(-1372.56,-1737.25) 1(-1372.56,-1737.25) 1(-1372.56,-1737.12) 1(-1372.56,-1737.12) 1(-1372.56,-1737.13) 1(-1372.56,-1737.13) 1(-1372.56,-1737.09) 1(-1372.56,-1737.09) 1(-1372.56,-1737.13) 1(-1372.56,-1737.13) 1(-1372.56,-1737.07) 1(-1372.56,-1737.07) 1(-1372.56,-1737.3) 1(-1372.56,-1737.3) 1(-1372.56,-1737.09) 1(-1372.56,-1737.09) 1(-1372.56,-1737.05) 1(-1372.56,-1737.05) 1(-1372.56,-1737.13) 1(-1372.56,-1737.13) 1(-1372.55,-1737.05) 1(-1372.55,-1737.05) 1(-1372.55,-1737.03) 1(-1372.55,-1737.03) 1(-1372.55,-1737.04) 1(-1372.55,-1737.04) 1(-1372.55,-1737.01) 1(-1372.55,-1737.01) 1(-1372.55,-1737.04) 1(-1372.55,-1737.04) 1(-1372.55,-1737.04) 1(-1372.55,-1737.04) 1(-1372.55,-1737.04) 1(-1372.55,-1737.04) 1(-1372.55,-1737.03) 1(-1372.55,-1737.03) 1(-1372.55,-1737.13) 1(-1372.55,-1737.13) 1(-1372.55,-1737.01) 1(-1372.55,-1737.01) 1(-1372.55,-1737.04) 1(-1372.55,-1737.04) 1(-1372.55,-1737.03) 1(-1372.55,-1737.03) 1(-1372.55,-1737.13) 1(-1372.55,-1737.13) 1(-1372.55,-1737.05) 1(-1372.55,-1737.05) 1(-1372.55,-1737.03) 1(-1372.55,-1737.03) 1(-1372.55,-1737.02) 1(-1372.55,-1737.02) 1(-1372.55,-1737.13) 1(-1372.55,-1737.13) 1(-1372.55,-1737.02) 1(-1372.55,-1737.02) 1(-1372.55,-1737.05) 1(-1372.55,-1737.05) 1(-1372.55,-1737.06) 1(-1372.55,-1737.06) 1(-1372.55,-1737.13) 1(-1372.55,-1737.13) 1(-1372.55,-1737.02) 1(-1372.55,-1737.02) 1(-1372.54,-1737.03) 1(-1372.54,-1737.03) 1(-1372.54,-1737) 1(-1372.54,-1737) 1(-1372.54,-1737.03) 1(-1372.54,-1737.03) 1(-1372.54,-1737.04) 1(-1372.54,-1737.04) 1(-1372.54,-1737.02) 1(-1372.54,-1737.02) 1(-1372.54,-1737.02) 1(-1372.54,-1737.02) 1(-1372.54,-1737.01) 1(-1372.54,-1737.01) 1(-1372.54,-1737.08) 1(-1372.54,-1737.08) 1(-1372.54,-1737.04) 1(-1372.54,-1737.04) 1(-1372.54,-1737.02) 1(-1372.54,-1737.02) 1(-1372.54,-1737) 1(-1372.54,-1737) 1(-1372.54,-1737.06) 1(-1372.54,-1737.06) 1(-1372.54,-1737.12) 1(-1372.54,-1737.12) 1(-1372.54,-1737.28) 1(-1372.54,-1737.28) 1(-1372.54,-1737.05) 1(-1372.54,-1737.05) 1(-1372.54,-1737.13) 1(-1372.54,-1737.13) 1(-1372.54,-1737.04) 1(-1372.54,-1737.04) 1(-1372.54,-1737.03) 1(-1372.54,-1737.03) 1(-1372.54,-1736.99) 1(-1372.54,-1736.99) 1(-1372.54,-1737.02) 1(-1372.54,-1737.02) 1(-1372.54,-1737.13) 1(-1372.54,-1737.13) 1(-1372.54,-1737.03) 1(-1372.54,-1737.03) 1(-1372.54,-1737.04) 1(-1372.54,-1737.04) 1(-1372.54,-1737.13) 1(-1372.54,-1737.13) 1(-1372.54,-1737.12) 1(-1372.54,-1737.12) 1(-1372.54,-1737) 1(-1372.54,-1737) 1(-1372.54,-1737) 1(-1372.54,-1737) 1(-1372.54,-1737.09) 1(-1372.54,-1737.09) 1(-1372.54,-1737.03) 1(-1372.54,-1737.03) 1(-1372.54,-1737.03) 1(-1372.54,-1737.03) 1(-1372.54,-1737.07) 1(-1372.54,-1737.07) 1(-1372.54,-1737.04) 1(-1372.54,-1737.04) 1(-1372.54,-1736.98) 1(-1372.54,-1736.98) 1(-1372.54,-1736.99) 1(-1372.54,-1736.99) 1(-1372.54,-1737.06) 1(-1372.54,-1737.06) 1(-1372.54,-1737.03) 1(-1372.54,-1737.03) 1(-1372.54,-1737.04) 1(-1372.54,-1737.04) 1(-1372.54,-1737.03) 1(-1372.54,-1737.03) 1(-1372.54,-1737.02) 1(-1372.54,-1737.02) 1(-1372.54,-1737.06) 1(-1372.54,-1737.06) 1(-1372.54,-1737.05) 1(-1372.54,-1737.05) 1(-1372.54,-1737.03) 1(-1372.54,-1737.03) 1(-1372.54,-1737.05) 1(-1372.54,-1737.05) 1(-1372.54,-1737.04) 1(-1372.54,-1737.04) 1(-1372.54,-1737.04) 1(-1372.54,-1737.04) 1(-1372.53,-1736.99) 1(-1372.53,-1736.99) 1(-1372.53,-1737.1) 1(-1372.53,-1737.1) 1(-1372.53,-1737.07) 1(-1372.53,-1737.07) 1(-1372.53,-1737.13) 1(-1372.53,-1737.13) 1(-1372.53,-1737.07) 1(-1372.53,-1737.07) 1(-1372.53,-1736.98) 1(-1372.53,-1736.98) 1(-1372.53,-1737.05) 1(-1372.53,-1737.05) 1(-1372.53,-1736.98) 1(-1372.53,-1736.98) 1(-1372.53,-1737.02) 1(-1372.53,-1737.02) 1(-1372.53,-1737.13) 1(-1372.53,-1737.13) 1(-1372.53,-1737.07) 1(-1372.53,-1737.07) 1(-1372.53,-1737.03) 1(-1372.53,-1737.03) 1(-1372.53,-1736.98) 1(-1372.53,-1736.98) 1(-1372.53,-1737.03) 1(-1372.53,-1737.03) 1(-1372.53,-1737.04) 1(-1372.53,-1737.04) 1(-1372.53,-1737.02) 1(-1372.53,-1737.02) 1(-1372.53,-1736.98) 1(-1372.53,-1736.98) 1(-1372.53,-1737.04) 1(-1372.53,-1737.04) 1(-1372.53,-1737.04) 1(-1372.53,-1737.04) 1(-1372.53,-1737.04) 1(-1372.53,-1737.04) 1(-1372.53,-1737.13) 1(-1372.53,-1737.13) 1(-1372.53,-1737.03) 1(-1372.53,-1737.03) 1(-1372.53,-1736.98) 1(-1372.53,-1736.98) 1(-1372.53,-1736.98) 1(-1372.53,-1736.98) 1(-1372.53,-1737.13) 1(-1372.53,-1737.13) 1(-1372.53,-1737.05) 1(-1372.53,-1737.05) 1(-1372.53,-1737.04) 1(-1372.53,-1737.04) 1(-1372.53,-1737.05) 1(-1372.53,-1737.05) 1(-1372.53,-1736.98) 1(-1372.53,-1736.98) 1(-1372.52,-1737.03) 1(-1372.52,-1737.03) 1(-1372.52,-1737.03) 1(-1372.52,-1737.03) 1(-1372.52,-1737.04) 1(-1372.52,-1737.04) 1(-1372.52,-1736.98) 1(-1372.52,-1736.98) 1(-1372.52,-1737.13) 1(-1372.52,-1737.13) 1(-1372.52,-1736.98) 1(-1372.52,-1736.98) 1(-1372.52,-1736.99) 1(-1372.52,-1736.99) 1(-1372.52,-1736.99) 1(-1372.52,-1736.99) 1(-1372.52,-1736.98) 1(-1372.52,-1736.98) 1(-1372.52,-1737.13) 1(-1372.52,-1737.13) 1(-1372.52,-1736.99) 1(-1372.52,-1736.99) 1(-1372.52,-1736.98) 1(-1372.52,-1736.98) 1(-1372.52,-1736.99) 1(-1372.52,-1736.99) 1(-1372.52,-1737.13) 1(-1372.52,-1737.13) 1(-1372.52,-1737.05) 1(-1372.52,-1737.05) 1(-1372.52,-1736.99) 1(-1372.52,-1736.99) 1(-1372.51,-1737.05) 1(-1372.51,-1737.05) 1(-1372.51,-1737.04) 1(-1372.51,-1737.04) 1(-1372.51,-1737.13) 1(-1372.51,-1737.13) 1(-1372.51,-1737.04) 1(-1372.51,-1737.04) 1(-1372.51,-1737.03) 1(-1372.51,-1737.03) 1(-1372.51,-1737.04) 1(-1372.51,-1737.04) 1(-1372.51,-1736.98) 1(-1372.51,-1736.98) 1(-1372.51,-1736.98) 1(-1372.51,-1736.98) 1(-1372.51,-1737.05) 1(-1372.51,-1737.05) 1(-1372.51,-1737.04) 1(-1372.51,-1737.04) 1(-1372.51,-1737.29) 1(-1372.51,-1737.29) 1(-1372.51,-1737.14) 1(-1372.51,-1737.14) 1(-1372.51,-1736.98) 1(-1372.51,-1736.98) 1(-1372.5,-1737.16) 1(-1372.5,-1737.16) 1(-1372.5,-1737.3) 1(-1372.5,-1737.3) 1(-1372.5,-1737.16) 1(-1372.5,-1737.16) 1(-1372.5,-1737.15) 1(-1372.5,-1737.15) 1(-1372.5,-1737.14) 1(-1372.5,-1737.14) 1(-1372.5,-1737.05) 1(-1372.5,-1737.05) 1(-1372.5,-1737.06) 1(-1372.5,-1737.06) 1(-1372.5,-1737.04) 1(-1372.5,-1737.04) 1(-1372.5,-1737.16) 1(-1372.5,-1737.16) 1(-1372.5,-1737.15) 1(-1372.5,-1737.15) 1(-1372.5,-1737.15) 1(-1372.5,-1737.15) 1(-1372.5,-1737.04) 1(-1372.5,-1737.04) 1(-1372.5,-1737) 1(-1372.5,-1737) 1(-1372.5,-1737) 1(-1372.5,-1737) 1(-1372.5,-1737) 1(-1372.5,-1737) 1(-1372.5,-1737.05) 1(-1372.5,-1737.05) 1(-1372.5,-1736.98) 1(-1372.5,-1736.98) 1(-1372.5,-1737.02) 1(-1372.5,-1737.02) 1(-1372.5,-1737) 1(-1372.5,-1737) 1(-1372.5,-1737.17) 1(-1372.5,-1737.17) 1(-1372.5,-1736.99) 1(-1372.5,-1736.99) 1(-1372.5,-1737.04) 1(-1372.5,-1737.04) 1(-1372.5,-1737.04) 1(-1372.5,-1737.04) 1(-1372.5,-1737.05) 1(-1372.5,-1737.05) 1(-1372.5,-1737.05) 1(-1372.5,-1737.05) 1(-1372.5,-1737.03) 1(-1372.5,-1737.03) 1(-1372.5,-1737) 1(-1372.5,-1737) 1(-1372.5,-1737.06) 1(-1372.5,-1737.06) 1(-1372.5,-1736.99) 1(-1372.5,-1736.99) 1(-1372.5,-1737.04) 1(-1372.5,-1737.04) 1(-1372.5,-1737.05) 1(-1372.5,-1737.05) 1(-1372.5,-1737.04) 1(-1372.5,-1737.04) 1(-1372.49,-1737) 1(-1372.49,-1737) 1(-1372.49,-1737) 1(-1372.49,-1737) 1(-1372.49,-1737.01) 1(-1372.49,-1737.01) 1(-1372.49,-1737) 1(-1372.49,-1737) 1(-1372.49,-1736.97) 1(-1372.49,-1736.97) 1(-1372.49,-1737.06) 1(-1372.49,-1737.06) 1(-1372.49,-1737.18) 1(-1372.49,-1737.18) 1(-1372.49,-1737.04) 1(-1372.49,-1737.04) 1(-1372.49,-1737.18) 1(-1372.49,-1737.18) 1(-1372.49,-1737.31) 1(-1372.49,-1737.31) 1(-1372.49,-1737.18) 1(-1372.49,-1737.18) 1(-1372.49,-1736.98) 1(-1372.49,-1736.98) 1(-1372.49,-1737.17) 1(-1372.49,-1737.17) 1(-1372.49,-1737.08) 1(-1372.49,-1737.08) 1(-1372.49,-1737.01) 1(-1372.49,-1737.01) 1(-1372.49,-1737.13) 1(-1372.49,-1737.13) 1(-1372.49,-1737.17) 1(-1372.49,-1737.17) 1(-1372.49,-1737.13) 1(-1372.49,-1737.13) 1(-1372.49,-1737.12) 1(-1372.49,-1737.12) 1(-1372.49,-1737.17) 1(-1372.49,-1737.17) 1(-1372.49,-1737.14) 1(-1372.49,-1737.14) 1(-1372.49,-1737.07) 1(-1372.49,-1737.07) 1(-1372.49,-1737.1) 1(-1372.49,-1737.1) 1(-1372.49,-1737.18) 1(-1372.49,-1737.18) 1(-1372.49,-1737.18) 1(-1372.49,-1737.18) 1(-1372.49,-1737.13) 1(-1372.49,-1737.13) 1(-1372.49,-1737.14) 1(-1372.49,-1737.14) 1(-1372.49,-1737.06) 1(-1372.49,-1737.06) 1(-1372.49,-1737.04) 1(-1372.49,-1737.04) 1(-1372.49,-1737.12) 1(-1372.49,-1737.12) 1(-1372.49,-1737.09) 1(-1372.49,-1737.09) 1(-1372.49,-1737.17) 1(-1372.49,-1737.17) 1(-1372.49,-1737.13) 1(-1372.49,-1737.13) 1(-1372.49,-1737.17) 1(-1372.49,-1737.17) 1(-1372.49,-1737.14) 1(-1372.49,-1737.14) 1(-1372.49,-1737.08) 1(-1372.49,-1737.08) 1(-1372.49,-1737.01) 1(-1372.49,-1737.01) 1(-1372.49,-1737.13) 1(-1372.49,-1737.13) 1(-1372.49,-1737.09) 1(-1372.49,-1737.09) 1(-1372.49,-1737.1) 1(-1372.49,-1737.1) 1(-1372.49,-1737.17) 1(-1372.49,-1737.17) 1(-1372.49,-1737.02) 1(-1372.49,-1737.02) 1(-1372.49,-1737.14) 1(-1372.49,-1737.14) 1(-1372.49,-1737.09) 1(-1372.49,-1737.09) 1(-1372.49,-1737.06) 1(-1372.49,-1737.06) 1(-1372.49,-1737.05) 1(-1372.49,-1737.05) 1(-1372.49,-1737.05) 1(-1372.49,-1737.05) 1(-1372.49,-1737.04) 1(-1372.49,-1737.04) 1(-1372.49,-1737.1) 1(-1372.49,-1737.1) 1(-1372.49,-1737.06) 1(-1372.49,-1737.06) 1(-1372.49,-1737.06) 1(-1372.49,-1737.06) 1(-1372.49,-1737.14) 1(-1372.49,-1737.14) 1(-1372.49,-1737.17) 1(-1372.49,-1737.17) 1(-1372.49,-1737.12) 1(-1372.49,-1737.12) 1(-1372.49,-1737.05) 1(-1372.49,-1737.05) 1(-1372.49,-1736.97) 1(-1372.49,-1736.97) 1(-1372.49,-1737.19) 1(-1372.49,-1737.19) 1(-1372.49,-1737.08) 1(-1372.49,-1737.08) 1(-1372.49,-1737.16) 1(-1372.49,-1737.16) 1(-1372.49,-1737.04) 1(-1372.49,-1737.04) 1(-1372.49,-1737.16) 1(-1372.49,-1737.16) 1(-1372.49,-1737.18) 1(-1372.49,-1737.18) 1(-1372.49,-1737.17) 1(-1372.49,-1737.17) 1(-1372.49,-1737.1) 1(-1372.49,-1737.1) 1(-1372.48,-1737.15) 1(-1372.48,-1737.15) 1(-1372.48,-1737.19) 1(-1372.48,-1737.19) 1(-1372.48,-1737.18) 1(-1372.48,-1737.18) 1(-1372.48,-1736.97) 1(-1372.48,-1736.97) 1(-1372.48,-1737.05) 1(-1372.48,-1737.05) 1(-1372.48,-1737.14) 1(-1372.48,-1737.14) 1(-1372.48,-1737.16) 1(-1372.48,-1737.16) 1(-1372.48,-1737.01) 1(-1372.48,-1737.01) 1(-1372.48,-1737.14) 1(-1372.48,-1737.14) 1(-1372.48,-1737.05) 1(-1372.48,-1737.05) 1(-1372.48,-1737.17) 1(-1372.48,-1737.17) 1(-1372.48,-1737.06) 1(-1372.48,-1737.06) 1(-1372.48,-1737.16) 1(-1372.48,-1737.16) 1(-1372.48,-1737.13) 1(-1372.48,-1737.13) 1(-1372.48,-1737.02) 1(-1372.48,-1737.02) 1(-1372.48,-1737.08) 1(-1372.48,-1737.08) 1(-1372.48,-1737.17) 1(-1372.48,-1737.17) 1(-1372.48,-1737.16) 1(-1372.48,-1737.16) 1(-1372.48,-1737.05) 1(-1372.48,-1737.05) 1(-1372.48,-1737.15) 1(-1372.48,-1737.15) 1(-1372.48,-1737.1) 1(-1372.48,-1737.1) 1(-1372.48,-1737.04) 1(-1372.48,-1737.04) 1(-1372.48,-1737.06) 1(-1372.48,-1737.06) 1(-1372.48,-1737.12) 1(-1372.48,-1737.12) 1(-1372.48,-1737.06) 1(-1372.48,-1737.06) 1(-1372.48,-1737.18) 1(-1372.48,-1737.18) 1(-1372.48,-1737.1) 1(-1372.48,-1737.1) 1(-1372.48,-1737.2) 1(-1372.48,-1737.2) 1(-1372.48,-1737.14) 1(-1372.48,-1737.14) 1(-1372.48,-1737.15) 1(-1372.48,-1737.15) 1(-1372.48,-1737.13) 1(-1372.48,-1737.13) 1(-1372.48,-1737.01) 1(-1372.48,-1737.01) 1(-1372.48,-1737.17) 1(-1372.48,-1737.17) 1(-1372.48,-1737.02) 1(-1372.48,-1737.02) 1(-1372.48,-1736.96) 1(-1372.48,-1736.96) 1(-1372.48,-1737.15) 1(-1372.48,-1737.15) 1(-1372.48,-1737.13) 1(-1372.48,-1737.13) 1(-1372.48,-1737.13) 1(-1372.48,-1737.13) 1(-1372.48,-1737.08) 1(-1372.48,-1737.08) 1(-1372.48,-1737.15) 1(-1372.48,-1737.15) 1(-1372.48,-1736.97) 1(-1372.48,-1736.97) 1(-1372.48,-1737.17) 1(-1372.48,-1737.17) 1(-1372.48,-1737.31) 1(-1372.48,-1737.31) 1(-1372.48,-1737.17) 1(-1372.48,-1737.17) 1(-1372.48,-1737.17) 1(-1372.48,-1737.17) 1(-1372.48,-1737.13) 1(-1372.48,-1737.13) 1(-1372.48,-1737.14) 1(-1372.48,-1737.14) 1(-1372.48,-1737.09) 1(-1372.48,-1737.09) 1(-1372.48,-1737.12) 1(-1372.48,-1737.12) 1(-1372.48,-1737.1) 1(-1372.48,-1737.1) 1(-1372.48,-1737.2) 1(-1372.48,-1737.2) 1(-1372.48,-1737.15) 1(-1372.48,-1737.15) 1(-1372.48,-1737.12) 1(-1372.48,-1737.12) 1(-1372.48,-1736.97) 1(-1372.48,-1736.97) 1(-1372.48,-1736.96) 1(-1372.48,-1736.96) 1(-1372.48,-1737.09) 1(-1372.48,-1737.09) 1(-1372.47,-1737.12) 1(-1372.47,-1737.12) 1(-1372.47,-1737.15) 1(-1372.47,-1737.15) 1(-1372.47,-1737.31) 1(-1372.47,-1737.31) 1(-1372.47,-1737.15) 1(-1372.47,-1737.15) 1(-1372.47,-1737.05) 1(-1372.47,-1737.05) 1(-1372.47,-1737.11) 1(-1372.47,-1737.11) 1(-1372.47,-1737.12) 1(-1372.47,-1737.12) 1(-1372.47,-1737.1) 1(-1372.47,-1737.1) 1(-1372.47,-1737.09) 1(-1372.47,-1737.09) 1(-1372.47,-1737.05) 1(-1372.47,-1737.05) 1(-1372.47,-1737.12) 1(-1372.47,-1737.12) 1(-1372.47,-1737.11) 1(-1372.47,-1737.11) 1(-1372.47,-1737.1) 1(-1372.47,-1737.1) 1(-1372.47,-1736.97) 1(-1372.47,-1736.97) 1(-1372.47,-1737.11) 1(-1372.47,-1737.11) 1(-1372.47,-1737.09) 1(-1372.47,-1737.09) 1(-1372.47,-1737.31) 1(-1372.47,-1737.31) 1(-1372.47,-1737.06) 1(-1372.47,-1737.06) 1(-1372.47,-1737.06) 1(-1372.47,-1737.06) 1(-1372.47,-1737.31) 1(-1372.47,-1737.31) 1(-1372.47,-1737.05) 1(-1372.47,-1737.05) 1(-1372.47,-1737.2) 1(-1372.47,-1737.2) 1(-1372.47,-1737.21) 1(-1372.47,-1737.21) 1(-1372.47,-1737.09) 1(-1372.47,-1737.09) 1(-1372.47,-1737.07) 1(-1372.47,-1737.07) 1(-1372.47,-1736.97) 1(-1372.47,-1736.97) 1(-1372.47,-1737.12) 1(-1372.47,-1737.12) 1(-1372.47,-1737.21) 1(-1372.47,-1737.21) 1(-1372.47,-1737.11) 1(-1372.47,-1737.11) 1(-1372.47,-1737.11) 1(-1372.47,-1737.11) 1(-1372.47,-1737.1) 1(-1372.47,-1737.1) 1(-1372.47,-1737.05) 1(-1372.47,-1737.05) 1(-1372.47,-1737.21) 1(-1372.47,-1737.21) 1(-1372.47,-1737.1) 1(-1372.47,-1737.1) 1(-1372.47,-1736.97) 1(-1372.47,-1736.97) 1(-1372.47,-1737.21) 1(-1372.47,-1737.21) 1(-1372.47,-1737.09) 1(-1372.47,-1737.09) 1(-1372.47,-1737.2) 1(-1372.47,-1737.2) 1(-1372.47,-1737.11) 1(-1372.47,-1737.11) 1(-1372.47,-1736.97) 1(-1372.47,-1736.97) 1(-1372.47,-1736.96) 1(-1372.47,-1736.96) 1(-1372.47,-1737.09) 1(-1372.47,-1737.09) 1(-1372.47,-1737.06) 1(-1372.47,-1737.06) 1(-1372.47,-1737.29) 1(-1372.47,-1737.29) 1(-1372.47,-1737.2) 1(-1372.47,-1737.2) 1(-1372.47,-1737.2) 1(-1372.47,-1737.2) 1(-1372.47,-1736.98) 1(-1372.47,-1736.98) 1(-1372.47,-1737.1) 1(-1372.47,-1737.1) 1(-1372.47,-1737.1) 1(-1372.47,-1737.1) 1(-1372.47,-1736.97) 1(-1372.47,-1736.97) 1(-1372.47,-1737.22) 1(-1372.47,-1737.22) 1(-1372.47,-1737.09) 1(-1372.47,-1737.09) 1(-1372.46,-1737.09) 1(-1372.46,-1737.09) 1(-1372.46,-1737.02) 1(-1372.46,-1737.02) 1(-1372.46,-1736.97) 1(-1372.46,-1736.97) 1(-1372.46,-1737.01) 1(-1372.46,-1737.01) 1(-1372.46,-1737.02) 1(-1372.46,-1737.02) 1(-1372.46,-1737.09) 1(-1372.46,-1737.09) 1(-1372.46,-1737.07) 1(-1372.46,-1737.07) 1(-1372.46,-1737.06) 1(-1372.46,-1737.06) 1(-1372.46,-1737.01) 1(-1372.46,-1737.01) 1(-1372.46,-1737.09) 1(-1372.46,-1737.09) 1(-1372.46,-1737.31) 1(-1372.46,-1737.31) 1(-1372.46,-1737.05) 1(-1372.46,-1737.05) 1(-1372.46,-1737.07) 1(-1372.46,-1737.07) 1(-1372.46,-1737.02) 1(-1372.46,-1737.02) 1(-1372.46,-1736.97) 1(-1372.46,-1736.97) 1(-1372.46,-1737.05) 1(-1372.46,-1737.05) 1(-1372.46,-1737.22) 1(-1372.46,-1737.22) 1(-1372.46,-1736.98) 1(-1372.46,-1736.98) 1(-1372.46,-1737.07) 1(-1372.46,-1737.07) 1(-1372.46,-1737.31) 1(-1372.46,-1737.31) 1(-1372.46,-1737.03) 1(-1372.46,-1737.03) 1(-1372.46,-1737.06) 1(-1372.46,-1737.06) 1(-1372.46,-1737.09) 1(-1372.46,-1737.09) 1(-1372.46,-1737.01) 1(-1372.46,-1737.01) 1(-1372.46,-1737.02) 1(-1372.46,-1737.02) 1(-1372.46,-1737.06) 1(-1372.46,-1737.06) 1(-1372.46,-1737.03) 1(-1372.46,-1737.03) 1(-1372.46,-1737.31) 1(-1372.46,-1737.31) 1(-1372.46,-1737.02) 1(-1372.46,-1737.02) 1(-1372.46,-1737.07) 1(-1372.46,-1737.07) 1(-1372.46,-1737.06) 1(-1372.46,-1737.06) 1(-1372.46,-1737.07) 1(-1372.46,-1737.07) 1(-1372.46,-1737.06) 1(-1372.46,-1737.06) 1(-1372.46,-1737.02) 1(-1372.46,-1737.02) 1(-1372.46,-1737.08) 1(-1372.46,-1737.08) 1(-1372.46,-1737.07) 1(-1372.46,-1737.07) 1(-1372.46,-1737.02) 1(-1372.46,-1737.02) 1(-1372.46,-1737.1) 1(-1372.46,-1737.1) 1(-1372.46,-1737.09) 1(-1372.46,-1737.09) 1(-1372.46,-1737.02) 1(-1372.46,-1737.02) 1(-1372.46,-1737.08) 1(-1372.46,-1737.08) 1(-1372.46,-1737.09) 1(-1372.46,-1737.09) 1(-1372.46,-1737.21) 1(-1372.46,-1737.21) 1(-1372.46,-1737.09) 1(-1372.46,-1737.09) 1(-1372.45,-1737.03) 1(-1372.45,-1737.03) 1(-1372.45,-1737.05) 1(-1372.45,-1737.05) 1(-1372.45,-1737.02) 1(-1372.45,-1737.02) 1(-1372.45,-1737.04) 1(-1372.45,-1737.04) 1(-1372.45,-1737.02) 1(-1372.45,-1737.02) 1(-1372.45,-1737.08) 1(-1372.45,-1737.08) 1(-1372.45,-1737.04) 1(-1372.45,-1737.04) 1(-1372.45,-1737.02) 1(-1372.45,-1737.02) 1(-1372.45,-1737.05) 1(-1372.45,-1737.05) 1(-1372.45,-1737.09) 1(-1372.45,-1737.09) 1(-1372.45,-1737.07) 1(-1372.45,-1737.07) 1(-1372.45,-1737.09) 1(-1372.45,-1737.09) 1(-1372.45,-1737.06) 1(-1372.45,-1737.06) 1(-1372.45,-1737.21) 1(-1372.45,-1737.21) 1(-1372.45,-1737.01) 1(-1372.45,-1737.01) 1(-1372.45,-1737.06) 1(-1372.45,-1737.06) 1(-1372.45,-1737.05) 1(-1372.45,-1737.05) 1(-1372.45,-1737.02) 1(-1372.45,-1737.02) 1(-1372.45,-1737.09) 1(-1372.45,-1737.09) 1(-1372.45,-1737.21) 1(-1372.45,-1737.21) 1(-1372.45,-1737.29) 1(-1372.45,-1737.29) 1(-1372.45,-1737.08) 1(-1372.45,-1737.08) 1(-1372.45,-1737.06) 1(-1372.45,-1737.06) 1(-1372.45,-1737.29) 1(-1372.45,-1737.29) 1(-1372.45,-1737.29) 1(-1372.45,-1737.29) 1(-1372.45,-1737.21) 1(-1372.45,-1737.21) 1(-1372.45,-1736.99) 1(-1372.45,-1736.99) 1(-1372.45,-1737.08) 1(-1372.45,-1737.08) 1(-1372.45,-1737.06) 1(-1372.45,-1737.06) 1(-1372.45,-1737.09) 1(-1372.45,-1737.09) 1(-1372.45,-1737.21) 1(-1372.45,-1737.21) 1(-1372.45,-1737.09) 1(-1372.45,-1737.09) 1(-1372.45,-1737.29) 1(-1372.45,-1737.29) 1(-1372.45,-1737.29) 1(-1372.45,-1737.29) 1(-1372.45,-1737.02) 1(-1372.45,-1737.02) 1(-1372.44,-1737.01) 1(-1372.44,-1737.01) 1(-1372.44,-1737.07) 1(-1372.44,-1737.07) 1(-1372.44,-1737.09) 1(-1372.44,-1737.09) 1(-1372.44,-1737.07) 1(-1372.44,-1737.07) 1(-1372.44,-1736.99) 1(-1372.44,-1736.99) 1(-1372.44,-1737.06) 1(-1372.44,-1737.06) 1(-1372.44,-1737.31) 1(-1372.44,-1737.31) 1(-1372.44,-1737.21) 1(-1372.44,-1737.21) 1(-1372.44,-1737.02) 1(-1372.44,-1737.02) 1(-1372.44,-1737.08) 1(-1372.44,-1737.08) 1(-1372.44,-1737.08) 1(-1372.44,-1737.08) 1(-1372.44,-1736.93) 1(-1372.44,-1736.93) 1(-1372.44,-1737.06) 1(-1372.44,-1737.06) 1(-1372.44,-1737.01) 1(-1372.44,-1737.01) 1(-1372.44,-1737.22) 1(-1372.44,-1737.22) 1(-1372.44,-1737.31) 1(-1372.44,-1737.31) 1(-1372.44,-1737.08) 1(-1372.44,-1737.08) 1(-1372.44,-1736.93) 1(-1372.44,-1736.93) 1(-1372.44,-1736.93) 1(-1372.44,-1736.93) 1(-1372.44,-1737.22) 1(-1372.44,-1737.22) 1(-1372.44,-1737.26) 1(-1372.44,-1737.26) 1(-1372.44,-1737.24) 1(-1372.44,-1737.24) 1(-1372.44,-1737.02) 1(-1372.44,-1737.02) 1(-1372.44,-1737.08) 1(-1372.44,-1737.08) 1(-1372.44,-1737.08) 1(-1372.44,-1737.08) 1(-1372.44,-1737.04) 1(-1372.44,-1737.04) 1(-1372.44,-1736.93) 1(-1372.44,-1736.93) 1(-1372.44,-1737.02) 1(-1372.44,-1737.02) 1(-1372.44,-1737.29) 1(-1372.44,-1737.29) 1(-1372.44,-1737.29) 1(-1372.44,-1737.29) 1(-1372.44,-1736.92) 1(-1372.44,-1736.92) 1(-1372.44,-1736.93) 1(-1372.44,-1736.93) 1(-1372.44,-1737.08) 1(-1372.44,-1737.08) 1(-1372.44,-1737) 1(-1372.44,-1737) 1(-1372.44,-1737.06) 1(-1372.44,-1737.06) 1(-1372.44,-1737.07) 1(-1372.44,-1737.07) 1(-1372.43,-1737.02) 1(-1372.43,-1737.02) 1(-1372.43,-1737.26) 1(-1372.43,-1737.26) 1(-1372.43,-1737.05) 1(-1372.43,-1737.05) 1(-1372.43,-1737.02) 1(-1372.43,-1737.02) 1(-1372.43,-1737.07) 1(-1372.43,-1737.07) 1(-1372.43,-1737.06) 1(-1372.43,-1737.06) 1(-1372.43,-1737.07) 1(-1372.43,-1737.07) 1(-1372.43,-1737) 1(-1372.43,-1737) 1(-1372.43,-1737.02) 1(-1372.43,-1737.02) 1(-1372.43,-1737.02) 1(-1372.43,-1737.02) 1(-1372.43,-1737.24) 1(-1372.43,-1737.24) 1(-1372.43,-1737.25) 1(-1372.43,-1737.25) 1(-1372.43,-1737.08) 1(-1372.43,-1737.08) 1(-1372.43,-1737.23) 1(-1372.43,-1737.23) 1(-1372.43,-1737.08) 1(-1372.43,-1737.08) 1(-1372.43,-1737.08) 1(-1372.43,-1737.08) 1(-1372.43,-1737) 1(-1372.43,-1737) 1(-1372.43,-1736.99) 1(-1372.43,-1736.99) 1(-1372.43,-1737.26) 1(-1372.43,-1737.26) 1(-1372.43,-1737.07) 1(-1372.43,-1737.07) 1(-1372.43,-1737.22) 1(-1372.43,-1737.22) 1(-1372.43,-1737.26) 1(-1372.43,-1737.26) 1(-1372.43,-1737.26) 1(-1372.43,-1737.26) 1(-1372.43,-1737.29) 1(-1372.43,-1737.29) 1(-1372.43,-1737.29) 1(-1372.43,-1737.29) 1(-1372.43,-1737.24) 1(-1372.43,-1737.24) 1(-1372.43,-1737.21) 1(-1372.43,-1737.21) 1(-1372.43,-1737.23) 1(-1372.43,-1737.23) 1(-1372.43,-1737.25) 1(-1372.43,-1737.25) 1(-1372.43,-1737) 1(-1372.43,-1737) 1(-1372.43,-1737.07) 1(-1372.43,-1737.07) 1(-1372.43,-1737.07) 1(-1372.43,-1737.07) 1(-1372.43,-1737.07) 1(-1372.43,-1737.07) 1(-1372.43,-1737.26) 1(-1372.43,-1737.26) 1(-1372.43,-1737.22) 1(-1372.43,-1737.22) 1(-1372.43,-1737.29) 1(-1372.43,-1737.29) 1(-1372.43,-1737.29) 1(-1372.43,-1737.29) 1(-1372.43,-1737.29) 1(-1372.43,-1737.29) 1(-1372.43,-1737.21) 1(-1372.43,-1737.21) 1(-1372.43,-1736.94) 1(-1372.43,-1736.94) 1(-1372.43,-1737.08) 1(-1372.43,-1737.08) 1(-1372.43,-1737.07) 1(-1372.43,-1737.07) 1(-1372.43,-1737) 1(-1372.43,-1737) 1(-1372.43,-1737.26) 1(-1372.43,-1737.26) 1(-1372.43,-1737.07) 1(-1372.43,-1737.07) 1(-1372.43,-1737.08) 1(-1372.43,-1737.08) 1(-1372.43,-1737.05) 1(-1372.43,-1737.05) 1(-1372.43,-1737.22) 1(-1372.43,-1737.22) 1(-1372.43,-1736.92) 1(-1372.43,-1736.92) 1(-1372.43,-1737)